# Altium PCB RK839.PcbDoc (part 2 of 3)
Units mm, origin at the board's own origin, x right, y up, seen from the top; angles counter-clockwise.
Board outline 303.12 x 189.36 mm, 2 copper layers (TopLayer, BottomLayer); 307 components, 971 nets, 714 pads, 1012 vias.
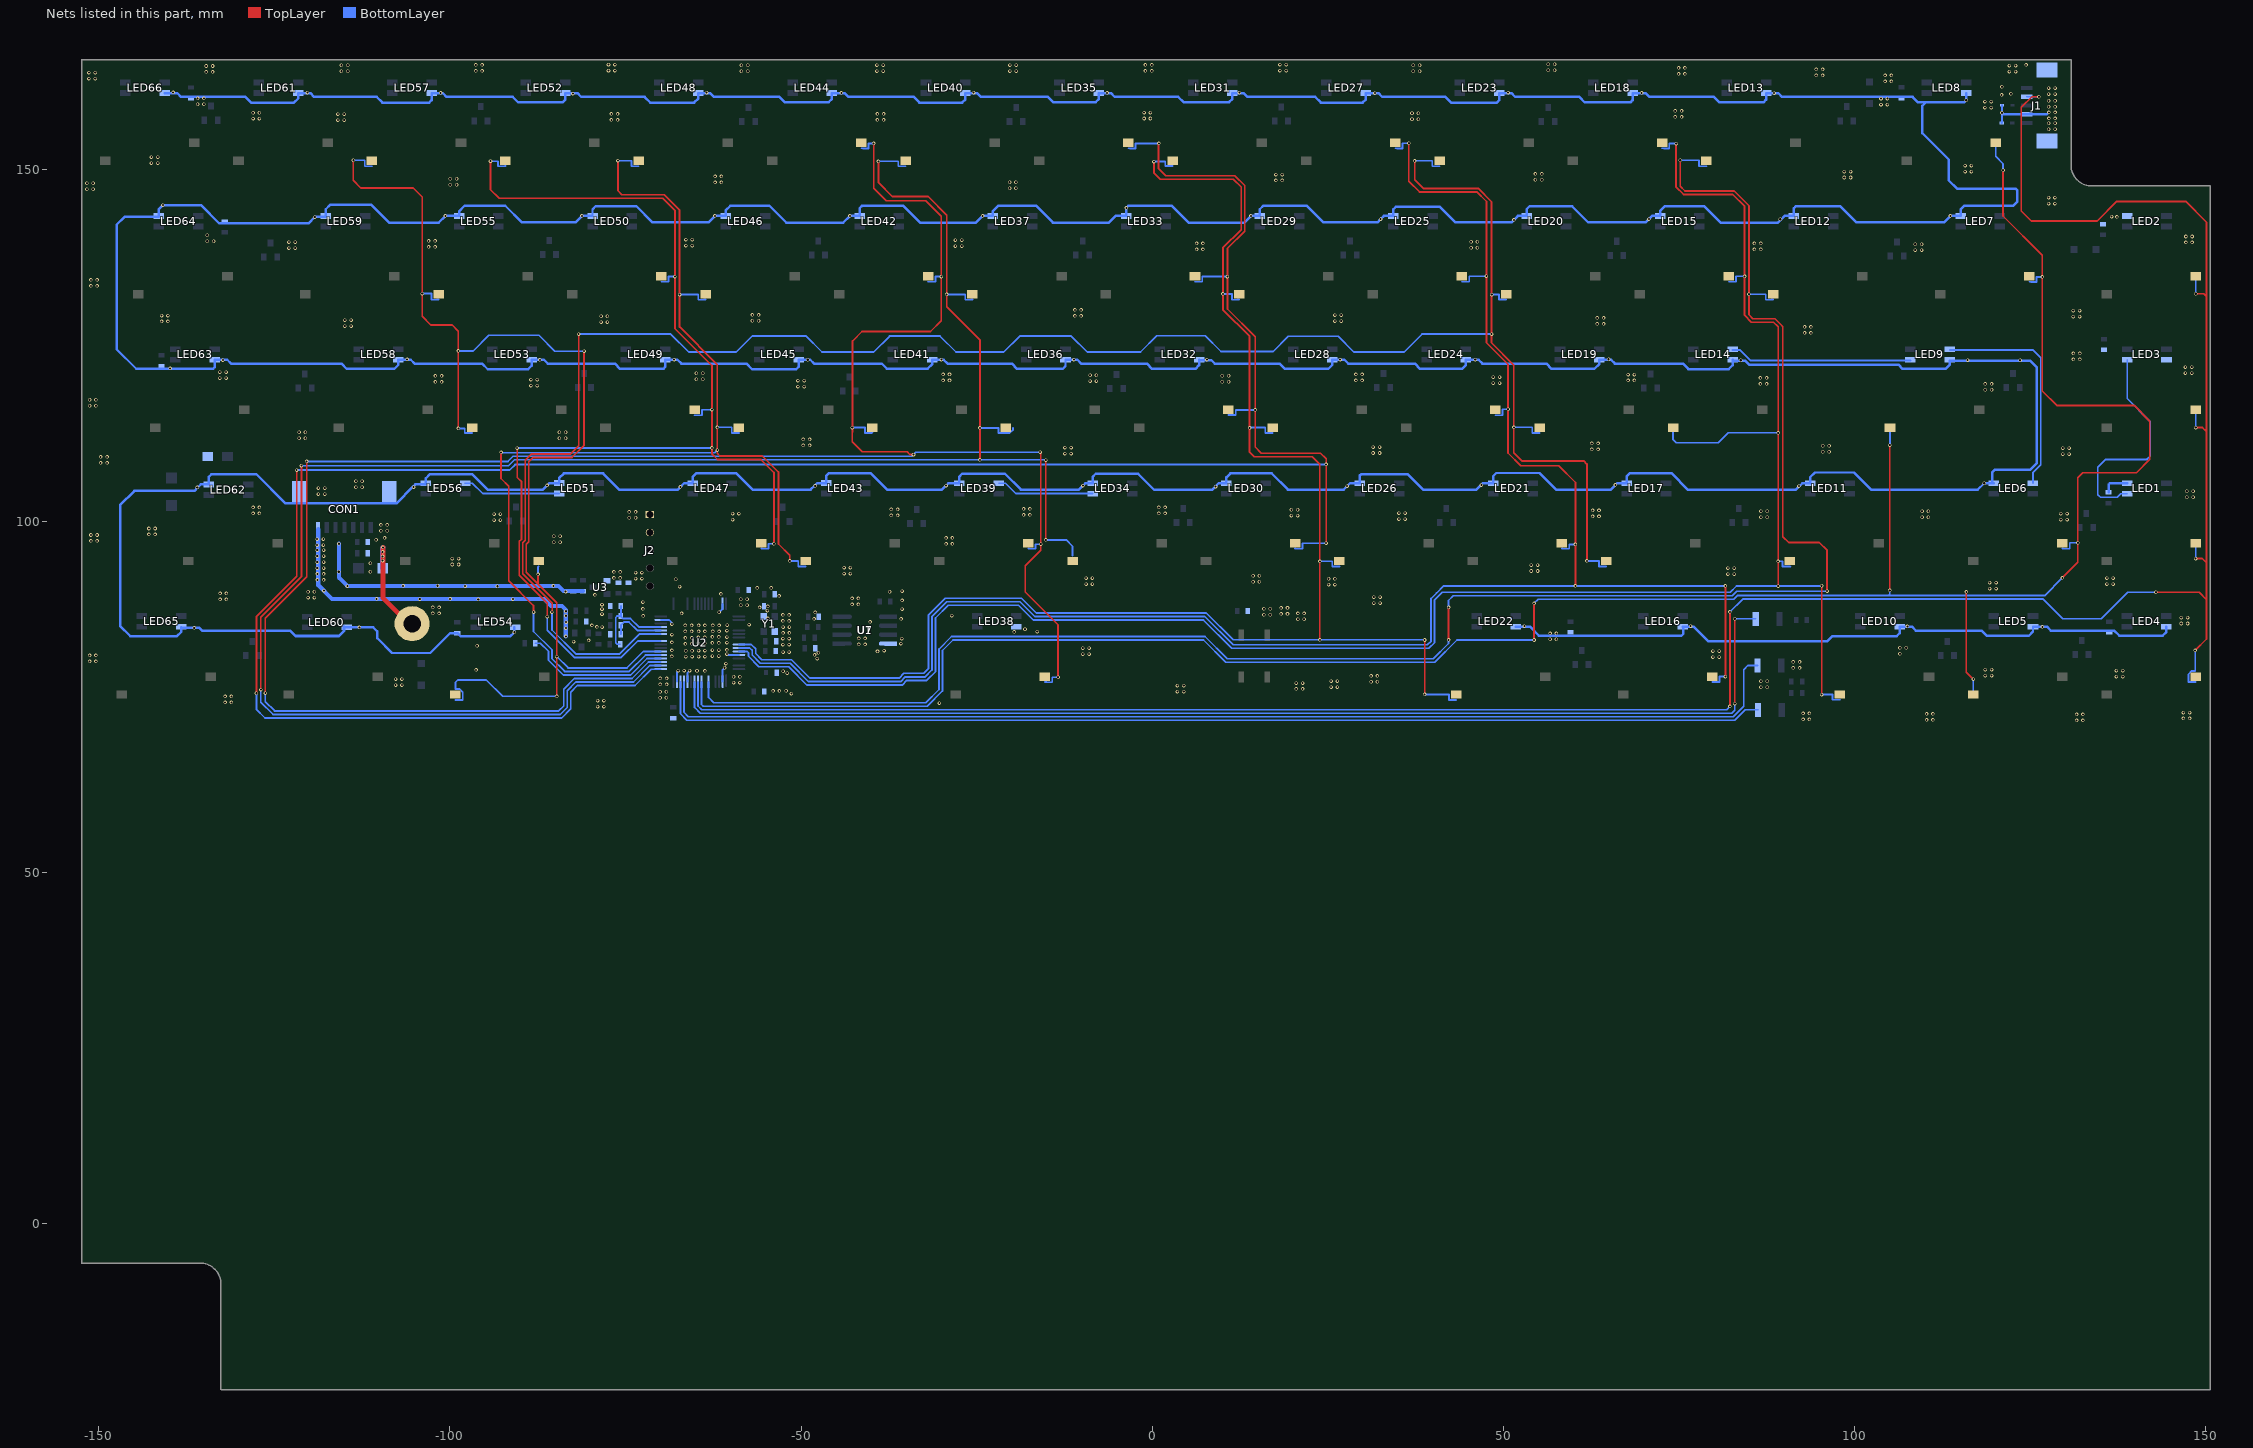
[diagram p2: the nets of this part, all layers, seen from the top]

## Via types
v1: diameter 0.5, hole 0.3, TopLayer to BottomLayer, tented both sides, 1012 vias

## Nets (pads, with @x,y where several pads share a name; then routed paths per layer and width w, separated by ;. In a path a pad name is that pad's centre, name@x,y a point inside that pad or via, vN(x,y) a via of type N, cw(c..) or ccw(c..) an arc to the next point about the centre after c; other vN are vias at no path point) (continued)
C2: S10.2 S12.2 S13.2 S14.2 S16.2 U2.38 | length 176.1
  TopLayer w0.25: v1(-113.756,151.375) -113.756,148.506 -112.675,147.425 -105.225,147.425 -103.95,146.15 v1(-103.95,132.4) -103.95,129.15 -102.725,127.925 -99.675,127.925 -98.8,127.05 v1(-98.8,124.225) v1(-98.8,113.2) ; v1(-87.45,92.426) -87.45,91.032 ; v1(-84.8,75.05) v1(-84.8,80.725) -84.8,88.382 -87.45,91.032 ; v1(-80.9,124.2) -80.9,110.793 -82.618,109.075 -88.143,109.075 -88.775,108.443 -88.775,97.054 -89.125,96.704 -89.125,92.707 -87.45,91.032
  BottomLayer w0.25: v1(-113.756,151.375) -112.147,151.375 -112.147,150.528 -111.356,150.528 -111.356,150.535 -111.224,150.535 -111.215,150.543 S10.2@-111.106,150.543 ; v1(-103.95,132.4) -102.643,132.4 -102.643,131.53 -101.853,131.53 -101.853,131.537 -101.72,131.537 -101.712,131.545 S12.2@-101.603,131.545 ; S13.2@-99.224,74.546 -99.115,74.546 -99.107,74.537 -98.974,74.537 -98.974,74.53 -98.184,74.53 -98.184,75.648 -98.647,76.111 -99.224,76.111 -99.224,77.026 -98.873,77.377 -94.817,77.377 -92.491,75.05 v1(-84.8,75.05) ; v1(-98.8,113.2) -97.89,113.2 -97.89,112.532 -97.1,112.532 -97.1,112.539 -96.967,112.539 -96.958,112.548 S14.2@-96.85,112.548 ; v1(-98.8,124.225) -96.7,124.225 -94.475,126.45 -87.322,126.45 -85.072,124.2 v1(-80.9,124.2) ; v1(-87.45,92.426) -87.45,93.471 S16.2@-87.35,93.571 ; v1(-84.8,80.725) -83.175,79.1 -74.798,79.1 -72.458,81.44 U2.38@-69.98,81.44
C03: 
C3: S15.2 S17.1 S18.1 S20.1 U2.41 | length 174.3
  TopLayer w0.25: v1(-94.225,151.25) -94.225,147.2 -93,145.975 -69.7,145.975 -67.975,144.25 v1(-67.975,134.825) -67.975,127.425 -62.7,122.15 v1(-62.7,115.875) v1(-62.7,110.425) -62.7,109.575 -61.9,108.775 -55.725,108.775 -53.875,106.925 v1(-53.875,96.775) ; v1(-90.425,110.4) -90.425,106.207 -89.8,105.582 -89.8,97.443 -90.125,97.118 -90.125,92.293 -86.146,88.314 -86.146,86.404 v1(-86.15,86.4)
  BottomLayer w0.25: v1(-94.225,151.25) -93.147,151.25 -93.147,150.528 -92.356,150.528 -92.356,150.535 -92.224,150.535 -92.215,150.543 S15.2@-92.125,150.543 ; S15.2@-92.106,150.543 S15.2@-92.125,150.543 ; S15.2@-92.1,150.571 -92.125,150.546 S15.2@-92.125,150.543 ; v1(-90.425,110.4) -62.725,110.4 v1(-62.7,110.425) ; v1(-86.15,86.4) -86.15,84.464 -82.286,80.6 -75.6,80.6 -73.26,82.94 U2.41@-69.98,82.94 ; S17.1@-69.921,134.086 -69.813,134.086 -69.804,134.077 -69.671,134.077 -69.671,134.07 -68.881,134.07 -68.881,134.825 v1(-67.975,134.825) ; S18.1@-65.167,115.086 -65.058,115.086 -65.05,115.077 -64.917,115.077 -64.917,115.07 -64.127,115.07 -64.127,115.875 v1(-62.7,115.875) ; S20.1@-55.673,96.087 -55.565,96.087 -55.556,96.079 -55.423,96.079 -55.423,96.072 -54.633,96.072 -54.633,96.775 v1(-53.875,96.775)
C04: 
C4: S19.2 S21.2 S22.2 S24.2 U2.37 | length 169.9
  TopLayer w0.25: v1(-92.725,109.775) -92.725,106.075 -91.625,104.975 -91.625,91.5 -88.1,87.975 v1(-88.1,87.05) ; v1(-76.075,151.318) -76.075,147.025 -75.525,146.475 -69.493,146.475 -67.3,144.282 v1(-67.3,132.25) -67.3,127.65 -61.925,122.275 v1(-61.925,113.35) v1(-61.925,110.1) -61.925,109.65 -61.55,109.275 -55.518,109.275 -53.225,106.982 -53.225,96.75 -51.625,95.15 v1(-51.625,94.325)
  BottomLayer w0.25: v1(-92.725,109.775) -92.7,109.75 -62.275,109.75 v1(-61.925,110.1) ; v1(-88.1,87.05) -88.1,84.293 -85.475,81.668 -85.475,80.4 -83.675,78.6 -74.487,78.6 -72.147,80.94 U2.37@-69.98,80.94 ; v1(-76.075,151.318) -74.157,151.318 -74.157,150.528 -73.366,150.528 -73.366,150.535 -73.234,150.535 -73.225,150.543 S19.2@-73.116,150.543 ; v1(-67.3,132.25) -64.647,132.25 -64.647,131.53 -63.857,131.53 -63.857,131.537 -63.724,131.537 -63.716,131.546 S21.2@-63.607,131.546 ; v1(-61.925,113.35) -59.892,113.35 -59.892,112.53 -59.102,112.53 -59.102,112.537 -58.969,112.537 -58.961,112.545 S22.2@-58.852,112.545 ; v1(-51.625,94.325) -50.399,94.325 -50.399,93.529 -49.608,93.529 -49.608,93.536 -49.475,93.536 -49.467,93.544 S24.2@-49.358,93.544
C05: 
C5: S23.1 S25.1 S26.2 S28.1 S29.1 U2.35 | length 321.7
  TopLayer w0.25: v1(-126.281,75.504) -126.281,86.175 -120.4,92.056 v1(-120.4,108.5) ; v1(-39.675,153.775) -39.675,147.4 -37.9,145.625 -32.275,145.625 -30.05,143.4 -30.05,128.525 -31.575,127 -41.325,127 -42.675,125.65 -42.675,112.75 -42.725,112.7 -42.725,111.282 -41.314,109.871 -34.889,109.871 -34.493,109.475 v1(-34,109.475) ; v1(-15.975,109.825) -15.875,109.725 v1(-15.875,96.725) -15.875,95.875 -18.1,93.65 -18.1,89.911 -13.425,85.236 v1(-13.425,77.775)
  BottomLayer w0.25: v1(-126.281,75.504) -126.281,74.288 -124.968,72.975 -84.5,72.975 -83.8,73.675 -83.8,76.075 -82.275,77.6 -74.073,77.6 -71.733,79.94 U2.35@-69.98,79.94 ; v1(-120.4,108.5) -91.741,108.5 -91.016,109.225 -34.25,109.225 v1(-34,109.475) -33.675,109.8 -16,109.8 v1(-15.975,109.825) ; v1(-42.725,113.325) -40.89,113.325 -40.89,112.558 -40.1,112.558 -40.1,112.565 -39.967,112.565 -39.958,112.573 S26.2@-39.85,112.573 ; S23.1@-41.434,153.083 -41.325,153.083 -41.317,153.075 -41.184,153.075 -41.184,153.068 -40.393,153.068 -40.393,153.775 v1(-39.675,153.775) ; S25.1@-31.921,134.086 -31.813,134.086 -31.804,134.077 -31.671,134.077 -31.671,134.07 -30.881,134.07 -30.881,134.825 v1(-30.025,134.825) ; S28.1@-17.673,96.087 -17.565,96.087 -17.556,96.079 -17.423,96.079 -17.423,96.072 -16.633,96.072 -16.633,96.725 v1(-15.875,96.725) ; S29.1@-15.291,77.086 -15.182,77.086 -15.174,77.077 -15.041,77.077 -15.041,77.07 -14.251,77.07 -14.251,77.775 v1(-13.425,77.775)
C06: 
C6: S27.2 S30.2 S31.2 S33.2 U2.34 | length 287.6
  TopLayer w0.25: v1(-126.925,76.025) -126.925,86.325 -121.15,92.1 v1(-121.15,107.9) ; v1(-39,151.225) -39,148.225 -37,146.225 -31.925,146.225 -29.275,143.575 v1(-29.275,132.275) -29.275,130.525 -24.55,125.8 v1(-24.55,113.275) v1(-24.55,108.725) ; v1(-15.175,97.325) v1(-15.175,108.7)
  BottomLayer w0.25: v1(-126.925,76.025) -126.925,74.225 -125.175,72.475 -84.293,72.475 -83.3,73.468 -83.3,75.868 -82.068,77.1 -73.866,77.1 -71.526,79.44 -70.972,79.44 U2.34@-69.98,79.44 ; v1(-121.15,107.9) -121.125,107.875 -91.659,107.875 -90.809,108.725 v1(-24.55,108.725) -15.2,108.725 v1(-15.175,108.7) ; v1(-39,151.225) -36.157,151.225 -36.157,150.528 -35.366,150.528 -35.366,150.535 -35.234,150.535 -35.225,150.543 S27.2@-35.116,150.543 ; v1(-29.275,132.275) -26.647,132.275 -26.647,131.53 -25.857,131.53 -25.857,131.537 -25.724,131.537 -25.716,131.546 S30.2@-25.607,131.546 ; v1(-24.55,113.275) -21.903,113.275 -21.903,112.556 -20.285,112.556 -19.823,113.019 S31.2@-19.823,113.275 ; v1(-15.175,97.325) -12.275,97.325 -11.356,96.406 S33.2@-11.356,95.097
C07: 
C7: S32.1 S34.1 S35.1 S37.1 U2.33 | length 345.5
  TopLayer w0.25: v1(-127.55,75.5) -127.55,86.407 -121.825,92.132 v1(-121.825,107.275) ; v1(0.95,153.775) 0.9,153.725 0.9,150.175 1.9,149.175 11.757,149.175 13.15,147.782 13.15,141.293 10.7,138.843 v1(10.7,134.825) 10.7,130.2 14.65,126.25 v1(14.65,115.825) 14.65,110.55 15.525,109.675 23.95,109.675 24.75,108.875 v1(24.75,108.075) v1(24.75,96.862)
  BottomLayer w0.25: v1(-127.55,75.5) -127.55,73.2 -126.325,71.975 -84.086,71.975 -82.8,73.261 -82.8,75.661 -81.861,76.6 -73.659,76.6 -71.344,78.915 U2.33@-69.98,78.915 ; v1(-121.825,107.275) -91.5,107.275 -90.725,108.05 24.725,108.05 v1(24.75,108.075) ; S32.1@-3.424,153.083 -3.316,153.083 -3.307,153.075 -3.174,153.075 -3.174,153.068 -2.384,153.068 -2.384,153.775 v1(0.95,153.775) ; S34.1@6.079,134.088 6.187,134.088 6.196,134.079 6.329,134.079 6.329,134.072 7.119,134.072 7.119,134.825 v1(10.7,134.825) ; S35.1@10.833,115.113 10.942,115.113 10.95,115.105 11.083,115.105 11.083,115.098 11.873,115.098 11.873,115.825 v1(14.65,115.825) ; S37.1@20.327,96.086 20.435,96.086 20.444,96.078 20.577,96.078 20.577,96.071 21.367,96.071 21.367,96.862 v1(24.75,96.862)
C08: 
C8: S36.2 S38.2 S39.2 S41.2 S45.2 U2.9 | length 229.9
  TopLayer w0.25: v1(0.225,151.2) 0.225,149.575 1.125,148.675 11.55,148.675 12.65,147.575 12.65,141.5 10.05,138.9 v1(10.05,132.35) 10.05,130.1 13.85,126.3 v1(13.85,113.275) 13.85,109.832 14,109.682 14,109.675 14.5,109.175 22.8,109.175 23.85,108.125 v1(23.85,94.275) v1(23.85,83.1) ; v1(38.775,75.325) v1(38.775,83.075)
  BottomLayer w0.25: U2.9@-58.855,82.44 -57.108,82.44 -56.475,81.807 -56.475,81.146 -55.604,80.275 -51.364,80.275 -48.743,77.654 -36.036,77.654 -35.364,78.325 -32.557,78.325 -31.875,79.007 -31.875,86.614 -29.464,89.025 -18.629,89.025 -16.529,86.925 7.687,86.925 11.512,83.1 v1(23.85,83.1) 38.75,83.1 v1(38.775,83.075) ; v1(0.225,151.2) 1.86,151.2 1.86,150.556 2.65,150.556 2.65,150.563 2.783,150.563 2.792,150.571 S36.2@2.9,150.571 ; v1(10.05,132.35) 10.054,132.346 11.353,132.346 11.353,131.53 12.143,131.53 12.143,131.537 12.276,131.537 12.284,131.546 S38.2@12.393,131.546 ; S38.2@12.393,132.346 S38.2@12.397,132.346 ; v1(13.85,113.275) 13.896,113.321 16.097,113.321 16.097,112.53 16.887,112.53 16.887,112.537 17.02,112.537 17.028,112.546 S39.2@17.137,112.546 ; v1(23.85,94.275) 25.605,94.275 25.605,93.529 26.395,93.529 26.395,93.536 26.528,93.536 26.536,93.544 S41.2@26.645,93.544 ; v1(38.775,75.325) 42.236,75.325 42.236,74.53 43.026,74.53 43.026,74.537 43.159,74.537 43.167,74.546 S45.2@43.276,74.546
C09: 
C9: S40.1 S42.1 S43.1 S46.1 S51.1 U2.10 | length 270.1
  TopLayer w0.25: v1(36.525,153.8) 36.525,148.4 38.05,146.875 46.2,146.875 47.575,145.5 v1(47.575,134.875) 47.575,125.4 50.65,122.325 v1(50.65,115.925) 50.65,109.7 52.475,107.875 57.875,107.875 60.25,105.5 v1(60.25,96.681) v1(60.25,90.775) ; v1(81.6,77.861) v1(81.6,90.775)
  BottomLayer w0.25: U2.10@-58.855,81.94 -57.315,81.94 -56.975,81.6 -56.975,80.939 -55.811,79.775 -51.572,79.775 -48.95,77.154 -35.829,77.154 -35.157,77.825 -32.35,77.825 -31.375,78.8 -31.375,86.407 -29.257,88.525 -18.836,88.525 -16.736,86.425 7.48,86.425 11.505,82.4 39.171,82.4 39.696,82.925 39.696,88.986 40.468,89.757 41.486,90.775 v1(60.25,90.775) v1(81.6,90.775) ; S40.1@34.576,153.083 34.685,153.083 34.693,153.075 34.826,153.075 34.826,153.068 35.617,153.068 35.617,153.8 v1(36.525,153.8) ; S42.1@44.079,134.086 44.187,134.086 44.196,134.077 44.329,134.077 44.329,134.07 45.119,134.07 45.119,134.875 v1(47.575,134.875) ; S43.1@48.833,115.088 48.942,115.088 48.95,115.079 49.083,115.079 49.083,115.072 49.873,115.072 49.873,115.925 v1(50.65,115.925) ; S46.1@58.327,96.087 58.435,96.087 58.444,96.079 58.577,96.079 58.577,96.072 59.367,96.072 59.367,96.681 v1(60.25,96.681) ; S51.1@79.713,77.111 79.822,77.111 79.83,77.103 79.963,77.103 79.963,77.096 80.753,77.096 80.753,77.861 v1(81.6,77.861)
C010: 
C10: S44.2 S47.2 S48.2 S50.2 U2.43 | length 302
  TopLayer w0.25: v1(-85.475,87.05) -85.45,87.075 -85.45,88.325 -89.625,92.5 -89.625,96.911 -89.275,97.261 -89.275,108.65 -88.35,109.575 -82.825,109.575 -81.675,110.725 v1(-81.675,126.625) ; v1(37.35,151.3) 37.35,148.625 38.6,147.375 46.407,147.375 48.3,145.482 v1(48.3,126.625) 48.3,125.382 51.475,122.207 v1(51.475,113.35) 51.475,109.725 52.625,108.575 61.425,108.575 61.875,108.125 v1(61.875,94.325)
  BottomLayer w0.25: v1(-85.475,87.05) -85.475,84.496 -82.079,81.1 -75.807,81.1 -72.967,83.94 U2.43@-69.98,83.94 ; v1(-81.675,126.625) -68.547,126.625 -65.997,124.075 -59.225,124.075 -56.925,126.375 -49.322,126.375 -47.022,124.075 -39.675,124.075 -37.4,126.35 -30.222,126.35 -27.947,124.075 -21.15,124.075 -18.875,126.35 -11.547,126.35 -9.272,124.075 -1.675,124.075 0.65,126.4 7.528,126.4 9.778,124.15 17.2,124.15 19.375,126.325 26.453,126.325 28.703,124.075 35.85,124.075 38.4,126.625 v1(48.3,126.625) ; v1(37.35,151.3) 39.853,151.3 39.853,150.528 40.644,150.528 40.644,150.535 40.776,150.535 40.785,150.543 S44.2@40.894,150.543 ; v1(48.325,132.25) 49.36,132.25 49.36,131.556 50.15,131.556 50.15,131.563 50.283,131.563 50.292,131.571 S47.2@50.4,131.571 ; v1(51.475,113.35) 54.11,113.35 54.11,112.53 54.9,112.53 54.9,112.537 55.033,112.537 55.042,112.546 S48.2@55.15,112.546 ; v1(61.875,94.325) 63.601,94.325 63.601,93.529 64.392,93.529 64.392,93.536 64.525,93.536 64.533,93.544 S50.2@64.642,93.544
C011: 
C11: S49.1 S52.1 S53.2 S56.2 S57.2 U2.11 | length 295
  TopLayer w0.25: v1(74.6,153.75) 74.55,153.7 74.55,147.593 75.643,146.5 82.65,146.5 84.325,144.825 v1(84.325,134.85) 84.325,129.3 85.3,128.325 88.45,128.325 89.125,127.65 v1(89.125,112.575) v1(89.125,90.76) ; v1(95.3,75.3) v1(95.3,90.795)
  BottomLayer w0.25: U2.11@-58.855,81.44 -57.665,81.44 -57.5,81.275 -57.5,80.757 -56.018,79.275 -51.779,79.275 -49.157,76.654 -35.621,76.654 -34.95,77.325 -32.1,77.325 -30.875,78.55 -30.875,86.2 -29.05,88.025 -19.043,88.025 -16.943,85.925 7.273,85.925 11.298,81.9 39.379,81.9 40.196,82.718 40.196,88.779 41.293,89.875 82.29,89.875 83.175,90.76 v1(89.125,90.76) 95.265,90.76 v1(95.3,90.795) ; S49.1@72.576,153.083 72.685,153.083 72.693,153.075 72.826,153.075 72.826,153.068 73.617,153.068 73.617,153.75 v1(74.6,153.75) ; S53.2@74.15,113.323 74.15,111.6 74.6,111.15 80.6,111.15 82.025,112.575 v1(89.125,112.575) ; S52.1@82.079,134.088 82.187,134.088 82.196,134.079 82.329,134.079 82.329,134.072 83.119,134.072 83.119,134.85 v1(84.325,134.85) ; v1(89.1,94.275) 89.72,94.275 89.72,93.53 90.51,93.53 90.51,93.537 90.643,93.537 90.651,93.545 S56.2@90.76,93.545 ; S56.2@90.766,93.571 S56.2@90.85,93.488 ; v1(95.3,75.3) 96.859,75.3 96.859,74.556 97.649,74.556 97.649,74.563 97.782,74.563 97.79,74.571 S57.2@97.899,74.571
C012: 
C12: S54.2 S55.2 U2.22 | length 265.3
  TopLayer w0.25: v1(42.175,83.1) v1(42.175,87.725) ; v1(75.175,151.375) 75.175,147.675 75.85,147 82.857,147 84.95,144.907 v1(84.95,132.3) 84.95,129.382 85.507,128.825 88.657,128.825 89.625,127.857 89.625,127.85 89.775,127.7 89.775,97.8 90.625,96.95 94.975,96.95 96.075,95.85 v1(96.075,90.05) v1@96.075,90
  BottomLayer w0.25: U2.22@-63.18,77.14 -63.18,74.905 -62.429,74.154 -32.254,74.154 -30.375,76.032 -30.375,81.782 -28.582,83.575 7.502,83.575 10.677,80.4 40,80.4 42.175,82.575 v1(42.175,83.1) ; v1(42.175,87.725) 42.175,88.7 42.85,89.375 82.557,89.375 83.207,90.025 v1@96.075,90.025 ; v1(75.175,151.375) 77.853,151.375 77.853,150.528 78.644,150.528 78.644,150.535 78.776,150.535 78.785,150.543 S54.2@78.894,150.543 ; v1(84.95,132.3) 87.356,132.3 87.356,131.532 88.146,131.532 88.146,131.539 88.279,131.539 88.287,131.548 S55.2@88.396,131.548
C013: 
C13: S58.2 S59.1 S60.1 S61.1 S62.2 U2.24 | length 346.1
  TopLayer w0.25: v1(54.35,83.075) v1(54.35,88.3) ; v1(105,90.125) v1(105,110.825) ; v1(115.9,89.925) 115.9,78.5 v1(116.9,77.5) ; v1(121.125,149.95) 121.125,143.45 126.725,137.85 v1(126.725,134.775) 126.725,118.525 128.775,116.475 139.785,116.475 142.025,114.235 142.025,108.8 140.125,106.9 132.475,106.9 131.775,106.2 v1(131.775,96.925) 131.775,94.125 v1(129.58,91.93)
  BottomLayer w0.25: U2.24@-64.18,77.14 -64.18,73.887 -63.946,73.654 -32.046,73.654 -29.875,75.825 -29.875,81.575 -28.375,83.075 7.295,83.075 10.47,79.9 40.207,79.9 43.382,83.075 v1(54.35,83.075) ; v1(54.35,88.3) 54.925,88.875 82.764,88.875 83.289,89.4 104.825,89.4 ; v1(105,90.125) 105,89.575 104.825,89.4 ; v1(105,110.825) 105.03,110.855 S58.2@105.03,113.321 ; v1(115.9,89.925) 115.9,89.525 115.775,89.4 ; S62.2@116.9,75.346 v1(116.9,77.5) ; S59.1@120.076,153.86 120.076,151.924 121.125,150.875 v1(121.125,149.95) ; S60.1@124.85,134.078 124.959,134.078 124.967,134.069 125.1,134.069 125.1,134.062 125.89,134.062 125.89,134.775 v1(126.725,134.775) ; S61.1@129.573,96.085 129.682,96.085 129.691,96.077 129.823,96.077 129.823,96.07 130.614,96.07 130.614,96.925 v1(131.775,96.925) ; v1(129.58,91.93) 127.05,89.4 115.775,89.4 ; 104.825,89.4 115.775,89.4
C014: 
C14: J1.4 S63.1 S64.1 S65.1 S66.1 U2.25 | length 365.3
  TopLayer w0.25: v1(82.25,73.625) v1(82.25,87.075) ; v1(126.225,160.425) 125.25,160.425 123.725,158.9 123.725,144.15 125.15,142.725 134.524,142.725 137.324,145.525 147.125,145.525 150.1,142.55 150.1,131.95 ; v1(142.895,89.875) 149.05,89.875 150.1,88.825 ; v1(148.475,81.6) 150.1,83.225 150.1,88.825 ; v1(148.55,94.675) 149.5,94.675 150.1,94.075 ; v1(148.566,113.32) 149.52,113.32 150.04,112.8 150.1,112.8 ; v1(148.566,132.375) 149.675,132.375 150.1,131.95 ; 150.1,88.825 150.1,94.075 ; 150.1,94.075 150.1,112.8 ; 150.1,112.8 150.1,131.95
  BottomLayer w0.25: U2.25@-64.68,77.14 -64.68,73.68 -64.154,73.154 81.779,73.154 v1(82.25,73.625) ; v1(82.25,87.075) 84.075,88.9 126.825,88.9 129.625,86.1 135.119,86.1 138.894,89.875 v1(142.895,89.875) ; J1.4@124.5,160.425 v1(126.225,160.425) ; v1(148.475,81.6) 148.475,78.676 147.988,78.676 147.525,78.214 147.525,77.096 148.316,77.096 148.316,77.103 148.448,77.103 148.457,77.111 S63.1@148.566,77.111 ; v1(148.55,94.675) 148.576,94.701 S64.1@148.576,96.86 ; v1(148.566,113.32) 148.581,113.335 S66.1@148.581,115.86 ; v1(148.566,132.375) 148.576,132.386 S65.1@148.576,134.86
C015: 
C15: 
C16: 
C16-1: 
C17: 
C18: 
C19: 
C20: 
C20-1: 
C21: 
C21-1: 
CAP: 
CAP-1: 
CAPS: 
CHGR: 
CHRG: 
CHRG1: 
CLK: 
CLK-A: 
CLKA: 
CSN: 
CSN-A: 
CSNA: 
D00: 
D01: 
D02: 
D03: 
D04: 
D05: 
D06: 
D+: C19.2 R9.2 R10.2 U2.45 | length 12.9
  BottomLayer w0.25: R10.2@-75.755,82.47 -76.195,82.47 -76.4,82.675 -76.4,86.275 -76.165,86.51 R9.2@-75.655,86.51 ; C19.2@-75.655,87.9 R9.2@-75.655,86.51 ; U2.45@-69.98,84.94 -73.108,84.94 -74.293,86.125 -75.297,86.125 -75.655,86.483 R9.2@-75.655,86.51
D++: 
D-: C18.2 R8.2 U2.44 | length 7.6
  BottomLayer w0.25: C18.2@-75.655,83.89 R8.2@-75.655,85.19 -75.22,85.625 -74.5,85.625 -73.315,84.44 U2.44@-69.98,84.44
D--: 
DI1: 
DIN: 
DM: 
DP: 
DV01: LED9.1 LED14.3 | length 25.9
  BottomLayer w0.3: LED14.3@82.643,124.352 83.698,124.352 85.2,122.85 LED9.1@107.923,122.85
DV02: LED6.1 LED9.3 | length 31.8
  BottomLayer w0.25: LED9.3@113.523,124.35 125.425,124.35 126.5,123.275 126.5,108.025 125.38,106.905 LED6.1@125.38,105.4
DV03: 
DV04: 
DV05: 
DV06: 
DV07: LED1.3 LED3.1 | length 31.6
  BottomLayer w0.25: LED1.3@138.8,103.9 137.875,103.9 137.37,103.395 135.005,103.395 134.625,103.775 134.625,107.675 135.737,108.787 141.612,108.787 142.1,109.275 142.1,114.16 138.8,117.46 LED3.1@138.8,122.975
DV08: 
DV09: LED34.3 LED39.1 | length 14
  BottomLayer w0.25: LED39.1@-21.875,105.4 -20.9,105.4 -19.433,103.933 LED34.3@-8.483,103.933
DV10: 
DV11: 
DV12: 
DV201: LED51.3 LED56.1 | length 14
  BottomLayer w0.25: LED56.1@-97.85,105.4 -96.8,105.4 -95.333,103.933 LED51.3@-84.483,103.933
DV202: 
DV203: 
DV204: 
DV205: 
DV206: 
DV207: 
DV208: 
DV209: 
DV210: 
DV211: 
DV212: 
ENC: 
ESD_1: 
FB: 
GG1: 
GND: C1.2 C2.1 C3.1 C4.2 C5.1 C6.2 C7.1 C8.1 C9.2 C10.1 C11.2 C12.1 C13.1 C14.1 C15.2 C16.1 C17.2 C18.1 C19.1 C20.2 C21.1 C22.1 C23.2 C24.2 C25.1 C26.1 C27.2 CA1.1 CON1.1 CON1.A CON1.B DRV1.1 DRV2.1 J1.2 J1.3@127.4,164.225 J2.1 J2.2 LED1.2 LED2.2 LED3.2 LED4.2 LED5.2 LED6.2 LED7.2 LED8.2 LED9.2 LED10.2 LED11.2 LED12.2 LED13.2 LED14.2 LED15.2 LED16.2 LED17.2 LED18.2 LED19.2 LED20.2 LED21.2 LED22.2 LED23.2 LED24.2 LED25.2 LED26.2 LED27.2 LED28.2 LED29.2 LED30.2 LED31.2 LED32.2 LED33.2 LED34.2 LED35.2 LED36.2 LED37.2 LED38.2 LED39.2 LED40.2 LED41.2 LED42.2 LED43.2 LED44.2 LED45.2 LED46.2 LED47.2 LED48.2 LED49.2 LED50.2 LED51.2 LED52.2 LED53.2 LED54.2 LED55.2 LED56.2 LED57.2 LED58.2 LED59.2 LED60.2 LED61.2 LED62.2 LED63.2 LED64.2 LED65.2 LED66.2 R4.2 R13.1 RA1.2 U1.4 U2.12 U2.18 U2.28 U2.31 U2.47 U2.63 U3.1 U7.4 Y1.3 Y1.4 | length 1534
  BottomLayer w0.25: U2.47@-69.98,85.94 -68.815,85.94 -68.4,85.525 v1(-68.4,85.35) ; U2.31@-67.68,77.14 -67.68,78.545 v1(-67.5,78.725) ; U2.28@-66.18,77.14 -66.18,78.42 v1(-65.875,78.725) ; v1(-61.68,87.025) -61.18,87.525 U2.63@-61.18,88.24 ; U2.18@-61.18,77.14 -61.18,78.845 v1(-60.9,79.125) ; v1(-60.575,81.075) -60.44,80.94 U2.12@-58.855,80.94
  BottomLayer w0.35: LED66.2@-140.6,160.95 -139.425,160.95 -138.828,160.95 -138.278,160.4 -129.125,160.4 -128.32,159.595 -122.205,159.595 -121.601,160.199 LED61.2@-121.601,160.95 -120.3,160.95 -119.878,160.95 -119.328,160.4 -110.425,160.4 -109.621,159.596 -102.954,159.596 -102.601,159.949 LED57.2@-102.601,160.95 -101.325,160.95 -101.028,160.95 -100.478,160.4 -91.05,160.4 -90.275,159.625 -83.95,159.625 -83.601,159.974 LED52.2@-83.601,160.95 -82.5,160.95 -81.853,160.95 -81.303,160.4 -72.275,160.4 -71.475,159.6 -65.225,159.6 -64.626,160.199 LED48.2@-64.626,160.95 -63.45,160.95 -62.978,160.95 -62.428,160.4 -53.1,160.4 -52.356,159.656 -46.069,159.656 -45.616,160.109 LED44.2@-45.616,160.95 -44.275,160.95 -43.803,160.95 -43.253,160.4 -33.95,160.4 -33.15,159.6 -27.075,159.6 -26.621,160.054 LED40.2@-26.621,160.95 -25.45,160.95 -24.953,160.95 -24.403,160.4 -14.875,160.4 -14.131,159.656 -8.044,159.656 -7.611,160.089 LED35.2@-7.611,160.95 -6.425,160.95 -5.903,160.95 -5.353,160.4 3.7,160.4 4.45,159.65 10.925,159.65 11.399,160.124 LED31.2@11.399,160.95 12.4,160.95 12.997,160.95 13.547,160.4 23.2,160.4 24,159.6 29.95,159.6 30.399,160.049 LED27.2@30.399,160.95 v1(31.7,160.95) 32.197,160.95 32.747,160.4 41.725,160.4 42.525,159.6 49.05,159.6 49.399,159.949 LED23.2@49.399,160.95 50.65,160.95 51.122,160.95 51.672,160.4 60.8,160.4 61.575,159.625 68.075,159.625 68.389,159.939 LED18.2@68.389,160.95 69.675,160.95 70.222,160.95 70.772,160.4 79.975,160.4 80.75,159.625 87,159.625 87.399,160.024 LED13.2@87.399,160.95 v1(88.525,160.95) 89.122,160.95 89.672,160.4 106.675,160.4 108.25,160.4 109.025,159.625 110.125,159.625 ; LED65.2@-138.25,84.925 -138.25,84.233 -138.859,83.624 -145.524,83.624 -146.95,85.05 -146.95,102.278 -144.919,104.309 -136.391,104.309 -135.938,104.763 -135.474,105.226 LED62.2@-134.331,105.226 -134.331,106.319 -133.975,106.675 -127.55,106.675 -123.401,102.526 -107.624,102.526 -105.237,104.913 -104.922,105.228 LED56.2@-103.461,105.228 ; LED65.2@-138.24,84.81 v1(-136.4,84.81) -135.663,84.81 -135.278,84.425 -122.751,84.425 -121.975,83.649 ; LED59.2@-117.675,143.35 -119.175,143.35 v1(-119.25,143.275) -120.125,142.4 -132.85,142.4 -135.45,145 v1(-140.875,145) -141.436,144.439 LED64.2@-141.436,143.45 -141.436,143.316 -146.334,143.316 -147.45,142.2 -147.45,124.475 -144.664,121.689 -139.85,121.689 -133.711,121.689 -133.477,121.923 LED63.2@-133.477,122.975 -132.325,122.975 -131.703,122.975 -131.153,122.425 -115.45,122.425 -114.714,121.689 -107.911,121.689 -107.357,122.243 LED58.2@-107.357,122.975 -106.1,122.975 -105.578,122.975 -105.028,122.425 -95.425,122.425 -94.625,121.625 -88.875,121.625 -88.347,122.153 LED53.2@-88.347,122.975 -87.2,122.975 -86.628,122.975 -86.078,122.425 -76.525,122.425 -75.781,121.681 -69.619,121.681 -69.357,121.943 LED49.2@-69.357,122.975 -68.075,122.975 -67.603,122.975 -67.053,122.425 -57.787,122.425 -56.985,121.623 -50.702,121.623 -50.354,121.971 LED45.2@-50.354,122.975 v1(-49.05,122.975) -48.703,122.975 -48.153,122.425 -38.525,122.425 -37.789,121.689 -31.986,121.689 -31.357,122.318 LED41.2@-31.357,122.975 -30.025,122.975 -29.703,122.975 -29.153,122.425 -20,122.425 -19.256,121.681 -12.744,121.681 -12.36,122.065 LED36.2@-12.36,122.975 -11.175,122.975 -10.675,122.975 -10.125,122.425 -0.775,122.425 -0.025,121.675 6.125,121.675 6.653,122.203 LED32.2@6.653,122.975 6.717,122.911 7.775,122.911 8.411,122.911 8.897,122.425 18.125,122.425 18.869,121.681 25.056,121.681 25.64,122.265 LED28.2@25.64,122.975 26.725,122.975 27.347,122.975 27.897,122.425 37.376,122.425 38.12,121.681 44.106,121.681 44.643,122.218 LED24.2@44.643,122.975 45.975,122.975 46.447,122.975 46.997,122.425 56.1,122.425 56.844,121.681 62.931,121.681 63.648,122.398 LED19.2@63.648,122.975 64.975,122.975 65.322,122.975 65.872,122.425 75.55,122.425 76.325,121.65 82.075,121.65 82.643,122.218 LED14.2@82.643,122.852 ; LED59.2@-117.675,143.45 -117.675,144.4 -117.05,145.025 -111.175,145.025 -108.65,142.5 -101.6,142.5 v1(-100.65,143.45) LED55.2@-98.7,143.45 -98.7,144.1 -97.9,144.9 -92.125,144.9 -89.758,142.533 -82.117,142.533 v1(-81.2,143.45) LED50.2@-79.7,143.45 -79.7,144.396 -79.271,144.825 -73.45,144.825 -71.158,142.533 -63.192,142.533 v1(-62.275,143.45) LED46.2@-60.7,143.45 -60.7,144.275 -60.075,144.9 -54.525,144.9 -52.125,142.5 -44,142.5 v1(-43.05,143.45) LED42.2@-41.675,143.45 -41.675,144.55 -41.35,144.875 -35.45,144.875 -33.075,142.5 -25.125,142.5 v1(-24.175,143.45) LED37.2@-22.7,143.45 -22.7,144.142 -21.917,144.925 -16.575,144.925 -14.15,142.5 -6.175,142.5 -5.225,143.45 LED33.2@-3.7,143.45 v1(-3.7,144.6) -3.425,144.875 2.8,144.875 5.175,142.5 13.1,142.5 v1(14.05,143.45) LED29.2@15.3,143.45 15.3,144.4 15.825,144.925 21.975,144.925 24.367,142.533 32.058,142.533 v1(32.517,142.992) 32.975,143.45 LED25.2@34.3,143.45 34.3,144.396 34.654,144.75 40.95,144.75 43.167,142.533 51.133,142.533 v1(51.475,142.875) 52.05,143.45 LED20.2@53.3,143.45 53.3,144.4 53.725,144.825 59.775,144.825 62.067,142.533 70.233,142.533 v1(70.692,142.992) 71.15,143.45 LED15.2@72.3,143.45 72.3,144.142 73.008,144.85 78.55,144.85 80.9,142.5 89.075,142.5 89.475,142.9 90.025,143.45 LED12.2@91.325,143.45 91.325,144.525 91.65,144.85 97.925,144.85 100.242,142.533 112.708,142.533 v1(113.625,143.45) LED7.2@115.075,143.45 115.075,144.375 115.625,144.925 122.6,144.925 123.175,145.5 123.175,147.066 122.891,147.35 114.575,147.35 113.4,148.525 113.4,151.475 109.625,155.25 109.625,159.125 110.125,159.625 ; LED60.2@-115.075,84.975 -115.075,84.875 v1(-112.9,84.875) -110.925,84.875 -110.35,84.3 -110.35,83.334 -108.242,81.226 -102.797,81.226 -99.959,84.063 C23.2@-98.95,84.063 -98.468,83.581 -91.427,83.581 v1(-90.825,84.183) LED54.2@-90.825,84.875 ; LED56.2@-103.45,105.4 -103.45,106.092 -102.85,106.691 -96.841,106.691 -94.633,104.483 -86.767,104.483 -86.162,105.088 -85.85,105.4 LED51.2@-84.45,105.4 ; LED51.2@-84.45,105.425 -84.45,106.117 -83.767,106.8 -78.2,106.8 -75.85,104.45 -67.625,104.45 v1(-67.2,104.875) -66.675,105.4 LED47.2@-65.46,105.4 -65.46,106.29 -64.95,106.8 -59.225,106.8 -56.908,104.483 -48.642,104.483 -48.045,105.08 -47.725,105.4 LED43.2@-46.46,105.4 ; LED43.2@-46.45,105.425 -46.45,106.425 -46.075,106.8 -40.075,106.8 -37.725,104.45 -29.987,104.45 -29.369,105.069 -29.037,105.4 LED39.2@-27.475,105.4 -27.475,106.346 -27.071,106.75 -20.975,106.75 -18.708,104.483 -10.442,104.483 v1(-9.875,105.05) -9.525,105.4 LED34.2@-8.45,105.4 -8.45,106.35 -8.05,106.75 -2.025,106.75 0.275,104.45 8.475,104.45 8.975,104.95 9.425,105.4 LED30.2@10.55,105.4 10.55,106.225 11.125,106.8 17,106.8 19.317,104.483 27.258,104.483 27.75,104.975 28.175,105.4 LED26.2@29.55,105.4 29.55,106.5 29.75,106.7 36.325,106.7 38.542,104.483 46.133,104.483 46.812,105.162 47.05,105.4 LED21.2@48.539,105.4 48.539,106.414 48.975,106.85 55.125,106.85 57.492,104.483 65.283,104.483 65.937,105.137 66.2,105.4 LED17.2@67.537,105.4 67.537,106.346 68.016,106.825 73.9,106.825 76.275,104.45 91.6,104.45 92.1,104.95 92.55,105.4 LED11.2@93.665,105.4 93.665,106.24 94.35,106.925 99.9,106.925 102.342,104.483 117.533,104.483 v1(118.45,105.4) LED6.2@119.78,105.4 119.575,105.605 119.575,106.9 120,107.325 125.022,107.325 125.95,108.253 125.95,121.875 124.975,122.85 123.55,122.85 116.075,122.85 113.523,122.85 113.523,122.25 112.954,121.681 106.819,121.681 106.225,122.275 84.962,122.275 84.385,122.852 83.775,122.852 LED14.2@82.643,122.852 ; LED22.2@51.775,84.975 53.752,84.975 55.045,83.681 75.344,83.681 75.625,83.962 75.625,84.875 LED16.2@75.525,84.975 77.072,84.975 79.172,82.875 96.078,82.875 96.827,83.624 105.993,83.624 106.398,84.029 LED10.2@106.398,84.975 108.147,84.975 108.697,84.425 118.05,84.425 118.825,83.65 124.78,83.65 125.389,84.259 LED5.2@125.389,84.975 127.372,84.975 127.922,84.425 136.95,84.425 137.694,83.681 143.856,83.681 144.375,84.2 LED4.2@144.375,84.975 ; LED14.2@82.643,122.975 LED14.2@82.643,122.852 ; LED8.2@115.894,160.95 v1(115.894,159.919) 115.6,159.625 110.125,159.625 ; DRV2.1@120.95,156.7 120.975,156.725 v1(120.975,158.15) ; DRV1.1@120.975,159.225 v1(120.975,158.15) ; v1(127.65,158.2) 127.375,157.925 J1.2@124.5,157.925 121.2,157.925 v1(120.975,158.15) ; C2.1@136.15,104.087 136.15,105.2 136.35,105.4 LED1.2@138.8,105.4
  BottomLayer w0.4: -121.975,83.649 -115.776,83.649 -115.075,84.35 LED60.2@-115.075,84.875
  BottomLayer w0.6: CON1.1@-118.756,98.841 -118.756,90.881 -116.775,88.9 v1(-104.3,88.9) v1(-91.05,88.9) -86.6,88.9 -85.6,87.9 -84.05,87.9 -83.5,87.35 v1(-83.5,87.175) v1(-83.5,83.6) ; v1(-115.806,96.775) -115.806,91.95 v1(-114.606,90.75) -84.525,90.75 -83.813,90.038 C21.1@-81.05,90.038
  other v1: 131.6,71.625 132.5,71.625 110.25,71.7 111.15,71.7 92.65,71.775 93.55,71.775 146.8,71.9 147.7,71.9 131.6,72.475 132.5,72.475 110.25,72.55 111.15,72.55 92.65,72.625 93.55,72.625 146.8,72.75 147.7,72.75 -78.975,73.6 -78.075,73.6 -30.325,74.1 -132.025,74.2 -131.125,74.2 -78.975,74.45 -78.075,74.45 -70.075,74.85 -69.175,74.85 -132.025,75.05 -131.125,75.05 -51.375,75.45 -70.075,75.7 -69.175,75.7 3.575,75.725 4.475,75.725 -54,75.825 -53.1,75.825 -52.15,75.85 20.5,76.1 21.4,76.1 86.65,76.35 87.55,76.35 25.45,76.375 26.35,76.375 3.575,76.575 4.475,76.575 -107.75,76.65 -106.85,76.65 -70.05,76.75 -69.15,76.75 20.5,76.95 21.4,76.95 -59.625,77 -58.725,77 31.15,77.125 32.05,77.125 86.65,77.2 87.55,77.2 25.45,77.225 26.35,77.225 -107.75,77.5 -106.85,77.5 -70.05,77.6 -69.15,77.6 -59.625,77.85 -58.725,77.85 137.275,77.861 138.175,77.861 31.15,77.975 32.05,77.975 118.6,78 119.5,78 -51.975,78.35 -52.575,78.625 -63.7,78.675 -64.825,78.7 137.275,78.711 138.175,78.711 -66.65,78.725 -96.275,78.825 118.6,78.85 119.5,78.85 91.25,79.1 92.15,79.1 -60.7,79.725 91.25,79.95 92.15,79.95 -151.3,80.025 -150.4,80.025 -47.7,80.425 79.825,80.65 80.725,80.65 -66.425,80.7 -65.525,80.7 -64.6,80.725 -63.7,80.725 -68.425,80.75 -62.625,80.775 -61.725,80.775 -151.3,80.875 -150.4,80.875 -48.075,80.95 -9.9,81.075 -9,81.075 106.45,81.125 -47.551,81.259 -52.575,81.35 -51.7,81.35 -39.125,81.44 79.825,81.5 80.725,81.5 -66.425,81.55 -65.525,81.55 -64.6,81.575 -63.7,81.575 -38.175,81.575 -68.4,81.6 -62.625,81.625 -61.725,81.625 -60.575,81.675 -9.9,81.925 -9,81.925 106.45,81.975 107.35,81.975 -96.125,82.25 -52.6,82.425 -51.7,82.425 -41.8,82.45 -40.9,82.45 -66.475,82.525 -65.575,82.525 -35.8,82.57 -64.625,82.6 -63.725,82.6 -62.625,82.675 -61.725,82.675 -60.575,82.7 -68.4,82.725 -82.4,82.85 -80.25,83.025 56.625,83.175 57.525,83.175 -52.6,83.275 -51.7,83.275 -35.675,83.275 -41.8,83.3 -40.9,83.3 -66.475,83.375 -65.575,83.375 -64.625,83.45 -63.725,83.45 -60.575,83.5 -62.625,83.525 -61.725,83.525 -68.4,83.85 56.625,84.025 57.525,84.025 -52.575,84.075 -51.675,84.075 -19.65,84.225 -16.375,84.275 -66.5,84.3 -65.6,84.3 -64.6,84.3 -63.7,84.3 -62.575,84.3 -61.675,84.3 -60.575,84.4 -18.125,84.6 -83.5,84.775 -78.325,84.925 -52.575,84.925 -51.675,84.925 -79.075,84.95 126.725,84.95 107.5,85.025 52.975,85.05 76.65,85.05 -79.8,85.15 -66.5,85.15 -65.6,85.15 -64.6,85.15 -63.7,85.15 -62.575,85.15 -61.675,85.15 -60.525,85.19 -57.4,85.275 146.5,85.425 147.4,85.425 -83.45,85.625 -40.175,85.65 -52.6,85.8 -51.7,85.8 20.725,86.025 21.625,86.025 -48.151,86.075 -35.775,86.075 -54.725,86.15 146.5,86.275 147.4,86.275 -72.475,86.5 -83.5,86.525 -28.55,86.55 -52.6,86.65 -51.7,86.65 15.9,86.675 16.8,86.675 -78.35,86.75 18.35,86.8 19.25,86.8 -102.45,86.875 -101.55,86.875 -67.025,86.875 20.725,86.875 21.625,86.875 -47.985,87.012 -54.792,87.256 -78.35,87.475 -35.625,87.475 -72.525,87.5 15.9,87.525 16.8,87.525 18.35,87.65 19.25,87.65 -102.45,87.725 -101.55,87.725 -55.9,87.725 -54.75,87.85 -58.6,88.025 -57.7,88.025 -78.35,88.125 -42.75,88.15 -41.85,88.15 31.525,88.325 32.425,88.325 -72.525,88.475 -35.625,88.725 -132.725,88.85 -131.825,88.85 -95.975,88.85 -58.6,88.875 -57.7,88.875 -110.45,88.925 -99.975,88.925 -42.75,89 -41.85,89 -120.2,89.1 -119.3,89.1 31.525,89.175 32.425,89.175 -53.125,89.35 -79.35,89.5 -61.425,89.65 -132.725,89.7 -131.825,89.7 -120.2,89.95 -119.3,89.95 -37.4,89.95 -83.525,89.975 -35.625,90.038 -117.95,90.1 119.225,90.4 120.125,90.4 -56.25,90.5 -54.25,90.5 -67.3,90.675 -93.25,90.725 -97.85,90.75 -106.675,90.775 -85.275,90.775 -101.75,90.8 25.1,90.95 26,90.95 -9.425,91.025 -8.525,91.025 135.9,91.025 136.8,91.025 119.225,91.25 120.125,91.25 14.35,91.375 15.25,91.375 -118.875,91.625 -117.975,91.625 -67.85,91.725 25.1,91.8 26,91.8 -73.575,91.825 -72.675,91.825 -9.425,91.875 -8.525,91.875 135.9,91.875 136.8,91.875 -76.655,91.925 -75.755,91.925 14.35,92.225 15.25,92.225 81.95,92.45 82.85,92.45 -118.875,92.475 -117.975,92.475 -43.875,92.525 -42.975,92.525 -73.575,92.675 -72.675,92.675 -76.655,92.775 -75.755,92.775 -115.825,92.8 -111.325,92.8 53.95,92.9 54.85,92.9 81.95,93.3 82.85,93.3 -118.9,93.325 -118,93.325 -43.875,93.375 -42.975,93.375 53.95,93.75 54.85,93.75 -99.675,93.825 -98.775,93.825 -111.325,94 -118.9,94.175 -118,94.175 -99.675,94.675 -98.775,94.675 -118.9,95.025 -118,95.025 -118.9,95.875 -118,95.875 -118.925,96.6 -118.025,96.6 -29.35,96.75 -28.45,96.75 -85.225,97 -84.325,97 -151.125,97.175 -150.225,97.175 -110.5,97.35 -118.925,97.45 -118.025,97.45 -29.35,97.6 -28.45,97.6 -109.3,97.625 -85.225,97.85 -84.325,97.85 -151.125,98.025 -150.225,98.025 -142.875,98.1 -141.975,98.1 -109.825,98.625 -108.925,98.625 -142.875,98.95 -141.975,98.95 -109.825,99.475 -108.925,99.475 -93.725,100.15 -92.825,100.15 -59.755,100.225 129.35,100.225 130.25,100.225 35.1,100.3 36,100.3 -74.475,100.475 -73.575,100.475 86.65,100.55 87.55,100.55 109.6,100.55 110.5,100.55 62.699,100.675 63.599,100.675 19.8,100.775 20.7,100.775 -37.175,100.825 -36.275,100.825 -18.325,100.9 -17.425,100.9 -93.725,101 -92.825,101 -59.755,101.075 -58.855,101.075 129.35,101.075 130.25,101.075 -128.025,101.1 -127.125,101.1 0.925,101.1 1.825,101.1 35.1,101.15 36,101.15 -74.475,101.325 -73.575,101.325 86.65,101.4 87.55,101.4 109.6,101.4 110.5,101.4 62.699,101.525 63.599,101.525 19.8,101.625 20.7,101.625 -37.175,101.675 -36.275,101.675 -18.325,101.75 -17.425,101.75 -128.025,101.95 -127.125,101.95 0.925,101.95 1.825,101.95 147.275,103.4 148.175,103.4 -118.725,103.85 -117.825,103.85 147.275,104.25 148.175,104.25 -118.725,104.7 -117.825,104.7 -135.975,104.8 -113.4,104.825 -112.5,104.825 -105.175,104.85 9,104.925 27.725,105 92.05,105 -47.989,105.025 -29.35,105.05 -86.175,105.1 46.85,105.125 65.925,105.15 -113.4,105.675 -112.5,105.675 -149.725,108.3 -148.825,108.3 -149.725,109.15 -148.825,109.15 129.625,109.55 130.525,109.55 -12.45,109.625 -11.55,109.625 31.45,109.7 32.35,109.7 95.45,109.875 96.35,109.875 62.575,110.225 63.475,110.225 129.625,110.4 130.525,110.4 -12.45,110.475 -11.55,110.475 31.45,110.55 32.35,110.55 95.45,110.725 96.35,110.725 -49.7,110.775 -48.8,110.775 62.575,111.075 63.475,111.075 -49.7,111.625 -48.8,111.625 -121.475,111.8 -120.575,111.8 -84.425,111.8 -83.525,111.8 -121.475,112.65 -120.575,112.65 -84.425,112.65 -83.525,112.65 -151.3,116.425 -150.4,116.425 -151.3,117.275 -150.4,117.275 118.6,118.7 119.5,118.7 -50.45,119.15 -49.55,119.15 -88.475,119.3 -87.575,119.3 86.575,119.55 87.475,119.55 118.6,119.55 119.5,119.55 48.55,119.65 49.45,119.65 -102.075,119.825 -101.175,119.825 9.957,119.85 10.857,119.85 -8.85,119.925 -7.95,119.925 -50.45,120 -49.55,120 67.75,120.025 68.65,120.025 -29.775,120.05 -28.875,120.05 28.975,120.05 29.875,120.05 -88.475,120.15 -87.575,120.15 -64.9,120.2 -64,120.2 -132.775,120.375 -131.875,120.375 86.575,120.4 87.475,120.4 48.55,120.5 49.45,120.5 -102.075,120.675 -101.175,120.675 9.957,120.7 10.857,120.7 -8.85,120.775 -7.95,120.775 67.75,120.875 68.65,120.875 -29.775,120.9 -28.875,120.9 28.975,120.9 29.875,120.9 -64.9,121.05 -64,121.05 147.1,121.075 148,121.075 -132.775,121.225 -131.875,121.225 -139.85,121.75 147.1,121.925 148,121.925 83.775,122.9 123.55,122.9 -132.325,122.925 116.075,122.925 -87.2,122.95 -68.075,123 -30.025,123 -11.175,123 7.775,123 26.725,123 45.975,123 -106.1,123.025 131.15,123.025 132.05,123.025 64.975,123.05 131.15,123.875 132.05,123.875 92.875,126.8 93.775,126.8 92.875,127.65 93.775,127.65 -114.975,127.775 -114.075,127.775 63.35,128.075 64.25,128.075 -78.475,128.325 -77.575,128.325 -141.05,128.425 -140.15,128.425 26,128.475 26.9,128.475 -56.95,128.525 -56.05,128.525 -114.975,128.625 -114.075,128.625 63.35,128.925 64.25,128.925 131.125,129.125 132.025,129.125 -78.475,129.175 -77.575,129.175 -11.025,129.225 -10.125,129.225 -141.05,129.275 -140.15,129.275 26,129.325 26.9,129.325 -56.95,129.375 -56.05,129.375 131.125,129.975 132.025,129.975 -11.025,130.075 -10.125,130.075 -151.125,133.5 -150.225,133.5 -151.125,134.35 -150.225,134.35 108.625,138.575 109.525,138.575 6.3,138.7 7.2,138.7 85.725,138.7 86.625,138.7 -122.925,138.875 -122.025,138.875 45.4,138.925 46.3,138.925 -103.025,139.05 -102.125,139.05 -28.025,139.15 -27.125,139.15 -66.4,139.225 -65.5,139.225 108.625,139.425 109.525,139.425 6.3,139.55 7.2,139.55 85.725,139.55 86.625,139.55 147.15,139.675 148.05,139.675 -122.925,139.725 -122.025,139.725 45.4,139.775 46.3,139.775 -134.55,139.85 -133.65,139.85 -103.025,139.9 -102.125,139.9 -28.025,140 -27.125,140 -66.4,140.075 -65.5,140.075 147.15,140.525 148.05,140.525 -134.55,140.7 89.4,142.975 137.325,143.325 136.575,143.35 127.6,145.2 128.5,145.2 127.6,146.05 128.5,146.05 -151.7,147.25 -150.8,147.25 -20.325,147.4 -19.425,147.4 -99.95,147.9 -99.05,147.9 -151.7,148.1 -150.8,148.1 -62.25,148.225 -61.35,148.225 -20.325,148.25 -19.425,148.25 17.6,148.5 18.5,148.5 54.55,148.6 55.45,148.6 -99.95,148.75 -99.05,148.75 98.525,148.925 99.425,148.925 -62.25,149.075 -61.35,149.075 17.6,149.35 18.5,149.35 54.55,149.45 55.45,149.45 98.525,149.775 99.425,149.775 115.725,149.776 116.625,149.776 115.725,150.626 116.625,150.626 -142.5,150.975 -141.6,150.975 -142.5,151.825 -141.6,151.825 127.625,155.8 128.525,155.8 127.625,156.65 128.525,156.65 -115.95,157.1 -115.05,157.1 -77.025,157.125 -76.125,157.125 -39.15,157.125 -38.25,157.125 36.975,157.225 37.875,157.225 -128.025,157.3 -127.125,157.3 -1.175,157.325 -0.275,157.325 127.65,157.35 128.55,157.35 74.45,157.55 75.35,157.55 -115.95,157.95 -115.05,157.95 -77.025,157.975 -76.125,157.975 -39.15,157.975 -38.25,157.975 36.975,158.075 37.875,158.075 -128.025,158.15 -127.125,158.15 -1.175,158.175 -0.275,158.175 128.55,158.2 74.45,158.4 75.35,158.4 118.55,158.875 119.45,158.875 127.625,159 128.525,159 103.75,159.3 104.65,159.3 -135.925,159.35 -135.025,159.35 118.55,159.725 119.45,159.725 127.625,159.85 128.525,159.85 103.75,160.15 104.65,160.15 -135.925,160.2 -135.025,160.2 120.925,160.675 127.625,160.8 128.525,160.8 122.25,160.85 -82.5,160.875 -101.325,160.975 -44.275,160.975 -6.425,160.975 69.675,160.975 -120.3,161 -63.45,161 12.4,161 50.65,161 -25.45,161.025 -139.425,161.05 127.625,161.65 128.525,161.65 120.95,161.85 104.325,162.6 105.225,162.6 -151.4,163 -150.5,163 104.325,163.45 105.225,163.45 94.525,163.475 95.425,163.475 74.925,163.675 75.825,163.675 -151.4,163.85 -150.5,163.85 -134.7,163.95 -133.8,163.95 122.025,164 122.925,164 -115.45,164.05 -114.55,164.05 -58.5,164.05 -57.6,164.05 37.15,164.05 38.05,164.05 -39.2,164.075 -38.3,164.075 -20.275,164.075 -19.375,164.075 -96.325,164.1 -95.425,164.1 -0.975,164.1 -0.075,164.1 -77.425,164.15 -76.525,164.15 18.175,164.15 19.075,164.15 56.375,164.2 57.275,164.2 94.525,164.325 95.425,164.325 74.925,164.525 75.825,164.525 -134.7,164.8 -133.8,164.8 122.025,164.85 122.925,164.85 -115.45,164.9 -114.55,164.9 -58.5,164.9 -57.6,164.9 37.15,164.9 38.05,164.9 -39.2,164.925 -38.3,164.925 -20.275,164.925 -19.375,164.925 -96.325,164.95 -95.425,164.95 -0.975,164.95 -0.075,164.95 124.4,164.95 -77.425,165 -76.525,165 18.175,165 19.075,165 56.375,165.05 57.275,165.05
GND-1: 
GNDA: 
GSD: DA1.2 pad.0 | length 16.3
  TopLayer w0.7: v1(-109.55,96.25) -109.55,89.075 -105.876,85.401 pad.0@-105.396,85.401
  BottomLayer w0.6: pad.0@-105.741,85.746 pad.0@-105.396,85.401
  BottomLayer w0.7: DA1.2@-109.585,93.308 -109.585,96.215 v1(-109.55,96.25)
  other v1: -109.575,94.375 -109.575,94.975 -109.575,95.625
LB1: 
LB2: 
LB3: 
LB4: 
LC1: LEDC3.1 U2.26 | length 168.3
  TopLayer w0.25: v1(82.925,86.1) 82.93,86.095 v1(82.93,74.02)
  BottomLayer w0.25: U2.26@-65.18,77.14 -65.18,73.473 -64.361,72.654 82.514,72.654 82.93,73.07 v1(82.93,74.02) ; v1(82.925,86.1) 82.935,86.09 LEDC3.1@85.908,86.09
LC2: LEDC2.1 U2.29 | length 163.5
  BottomLayer w0.25: U2.29@-66.68,77.14 -66.68,72.78 -66.054,72.154 82.721,72.154 84.204,73.636 84.204,78.85 84.815,79.461 LEDC2.1@86.162,79.461
LC3: LEDC1.1 U2.30 | length 159
  BottomLayer w0.25: U2.30@-67.18,77.14 -67.18,72.573 -66.261,71.654 82.929,71.654 84.411,73.136 LEDC1.1@86.238,73.136
LD1: 
LD2: 
LD3: 
LD4: 
LD5: 
LD6: 
LD7: 
LD8: 
LD9: 
LD10: 
LD11: 
LD12: 
LD13: 
LD14: 
LD15: 
LED1: 
LED1_INT: 
LED2: 
LED2_INT: 
LED3: 
LED4: 
LED5: 
LED6: 
LED7: 
LED8: 
LED9: 
LED10: 
LED11: 
LED12: 
LED13: 
LED14: 
LED15: 
LED16: 
LED17: 
LED18: 
LED19: 
LED20: 
LED21: 
LED-PWM0: R14.1 U2.36 | length 21.4
  BottomLayer w0.25: R14.1@-87.83,82.625 -87.139,82.625 -85.975,81.461 -85.975,80.193 -83.882,78.1 -74.28,78.1 -71.94,80.44 U2.36@-69.98,80.44
LED-PWM1: 
LED_R1/CLK: 
LED_R3: 
LED_R4: 
LED_R5: 
LED_R6: 

## Text inside footprints (layer, text, board x,y; h text height)
LED1: Mechanical6 "DOUT" at 143.758,105.718 h0.5 r180; Mechanical6 "VDD" at 143.885,104.194 h0.5 r180; Mechanical6 "GND" at 138.043,105.718 h0.5 r180; Mechanical6 "DIN" at 138.17,104.194 h0.5 r180
LED2: Mechanical6 "DIN" at 138.17,142.244 h0.5 r180; Mechanical6 "GND" at 138.043,143.768 h0.5 r180; Mechanical6 "VDD" at 143.885,142.244 h0.5 r180; Mechanical6 "DOUT" at 143.758,143.768 h0.5 r180
LED3: Mechanical6 "DOUT" at 139.442,122.657 h0.5; Mechanical6 "VDD" at 139.315,124.181 h0.5; Mechanical6 "GND" at 145.157,122.657 h0.5; Mechanical6 "DIN" at 145.03,124.181 h0.5
LED4: Mechanical6 "DIN" at 145.005,86.181 h0.5; Mechanical6 "GND" at 145.132,84.657 h0.5; Mechanical6 "VDD" at 139.29,86.181 h0.5; Mechanical6 "DOUT" at 139.417,84.657 h0.5
LED5: Mechanical6 "DIN" at 126.019,86.181 h0.5; Mechanical6 "GND" at 126.146,84.657 h0.5; Mechanical6 "VDD" at 120.304,86.181 h0.5; Mechanical6 "DOUT" at 120.431,84.657 h0.5
LED6: Mechanical6 "DIN" at 119.15,104.194 h0.5 r180; Mechanical6 "GND" at 119.023,105.718 h0.5 r180; Mechanical6 "VDD" at 124.865,104.194 h0.5 r180; Mechanical6 "DOUT" at 124.738,105.718 h0.5 r180
LED7: Mechanical6 "DIN" at 114.445,142.244 h0.5 r180; Mechanical6 "GND" at 114.318,143.768 h0.5 r180; Mechanical6 "VDD" at 120.16,142.244 h0.5 r180; Mechanical6 "DOUT" at 120.033,143.768 h0.5 r180
LED8: Mechanical6 "DIN" at 116.524,162.156 h0.5; Mechanical6 "GND" at 116.651,160.632 h0.5; Mechanical6 "VDD" at 110.809,162.156 h0.5; Mechanical6 "DOUT" at 110.936,160.632 h0.5
LED9: Mechanical6 "DIN" at 114.153,124.181 h0.5; Mechanical6 "GND" at 114.28,122.657 h0.5; Mechanical6 "VDD" at 108.438,124.181 h0.5; Mechanical6 "DOUT" at 108.565,122.657 h0.5
LED10: Mechanical6 "DIN" at 107.028,86.181 h0.5; Mechanical6 "GND" at 107.155,84.657 h0.5; Mechanical6 "VDD" at 101.313,86.181 h0.5; Mechanical6 "DOUT" at 101.44,84.657 h0.5
LED11: Mechanical6 "DIN" at 93.035,104.194 h0.5 r180; Mechanical6 "GND" at 92.908,105.718 h0.5 r180; Mechanical6 "VDD" at 98.75,104.194 h0.5 r180; Mechanical6 "DOUT" at 98.623,105.718 h0.5 r180
LED12: Mechanical6 "DIN" at 90.695,142.244 h0.5 r180; Mechanical6 "GND" at 90.568,143.768 h0.5 r180; Mechanical6 "VDD" at 96.41,142.244 h0.5 r180; Mechanical6 "DOUT" at 96.283,143.768 h0.5 r180
LED13: Mechanical6 "DIN" at 88.029,162.156 h0.5; Mechanical6 "GND" at 88.156,160.632 h0.5; Mechanical6 "VDD" at 82.314,162.156 h0.5; Mechanical6 "DOUT" at 82.441,160.632 h0.5
LED14: Mechanical6 "DIN" at 83.273,124.181 h0.5; Mechanical6 "GND" at 83.4,122.657 h0.5; Mechanical6 "VDD" at 77.558,124.181 h0.5; Mechanical6 "DOUT" at 77.685,122.657 h0.5
LED15: Mechanical6 "DIN" at 71.67,142.244 h0.5 r180; Mechanical6 "GND" at 71.543,143.768 h0.5 r180; Mechanical6 "VDD" at 77.385,142.244 h0.5 r180; Mechanical6 "DOUT" at 77.258,143.768 h0.5 r180
LED16: Mechanical6 "DIN" at 76.155,86.181 h0.5; Mechanical6 "GND" at 76.282,84.657 h0.5; Mechanical6 "VDD" at 70.44,86.181 h0.5; Mechanical6 "DOUT" at 70.567,84.657 h0.5
LED17: Mechanical6 "DIN" at 66.907,104.194 h0.5 r180; Mechanical6 "GND" at 66.78,105.718 h0.5 r180; Mechanical6 "VDD" at 72.622,104.194 h0.5 r180; Mechanical6 "DOUT" at 72.495,105.718 h0.5 r180
LED18: Mechanical6 "DOUT" at 63.431,160.632 h0.5; Mechanical6 "VDD" at 63.304,162.156 h0.5; Mechanical6 "GND" at 69.146,160.632 h0.5; Mechanical6 "DIN" at 69.019,162.156 h0.5
LED19: Mechanical6 "DIN" at 64.278,124.181 h0.5; Mechanical6 "GND" at 64.405,122.657 h0.5; Mechanical6 "VDD" at 58.563,124.181 h0.5; Mechanical6 "DOUT" at 58.69,122.657 h0.5
LED20: Mechanical6 "DIN" at 52.67,142.244 h0.5 r180; Mechanical6 "GND" at 52.543,143.768 h0.5 r180; Mechanical6 "VDD" at 58.385,142.244 h0.5 r180; Mechanical6 "DOUT" at 58.258,143.768 h0.5 r180
LED21: Mechanical6 "DIN" at 47.909,104.194 h0.5 r180; Mechanical6 "GND" at 47.782,105.718 h0.5 r180; Mechanical6 "VDD" at 53.624,104.194 h0.5 r180; Mechanical6 "DOUT" at 53.497,105.718 h0.5 r180
LED22: Mechanical6 "DIN" at 52.405,86.181 h0.5; Mechanical6 "GND" at 52.532,84.657 h0.5; Mechanical6 "VDD" at 46.69,86.181 h0.5; Mechanical6 "DOUT" at 46.817,84.657 h0.5
LED23: Mechanical6 "DIN" at 50.029,162.156 h0.5; Mechanical6 "GND" at 50.156,160.632 h0.5; Mechanical6 "VDD" at 44.314,162.156 h0.5; Mechanical6 "DOUT" at 44.441,160.632 h0.5
LED24: Mechanical6 "DIN" at 45.273,124.181 h0.5; Mechanical6 "GND" at 45.4,122.657 h0.5; Mechanical6 "VDD" at 39.558,124.181 h0.5; Mechanical6 "DOUT" at 39.685,122.657 h0.5
LED25: Mechanical6 "DIN" at 33.67,142.244 h0.5 r180; Mechanical6 "GND" at 33.543,143.768 h0.5 r180; Mechanical6 "VDD" at 39.385,142.244 h0.5 r180; Mechanical6 "DOUT" at 39.258,143.768 h0.5 r180